# Altium PCB STAND_SSD_2246(CPU).PcbDoc (part 6 of 7)
Units mm, origin at the board's own origin, x right, y up, seen from the top; angles counter-clockwise.
Board outline 70 x 170 mm, 8 copper layers (L1:Top, L2:GND, L3:Sig, L4:VCC, L5:Sig, L6:Sig, L7:GND, L8:Bot), stack 1.112 mm thick; 174 components, 271 nets, 1671 pads, 771 vias.
Unrouted connection lines stored in the file: 138.
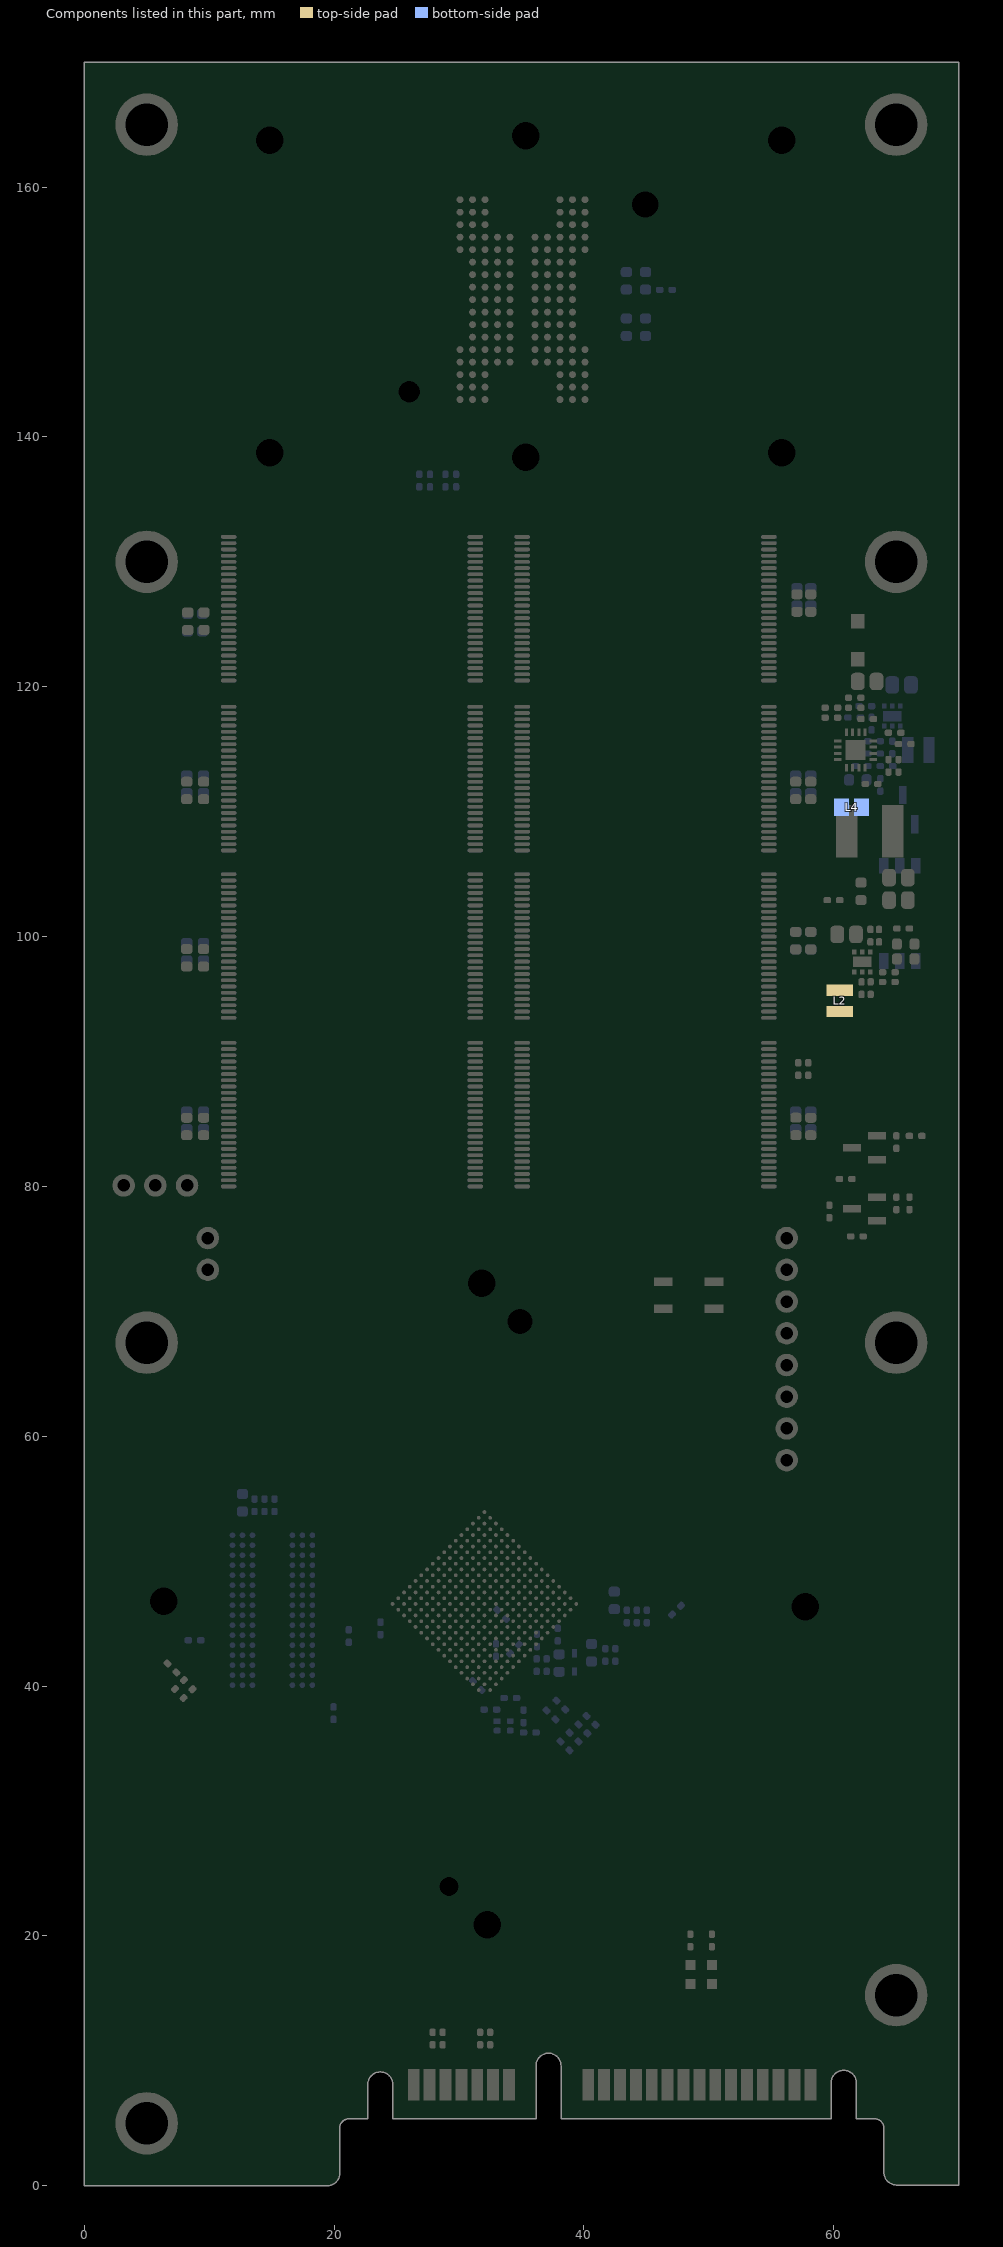
[diagram p12: the components of this part, seen from the top]

## Other copper (continued)
L5:Sig:
  pour cut-out: 50.503,87.796 ccw(c50.948,87.727) 51.392,87.796 ccw(c50.948,87.698)
  pour cut-out: 33.121,151.571 ccw(c33.565,151.502) 34.01,151.571 ccw(c33.565,151.473)
  pour cut-out: 32.121,146.571 ccw(c32.565,146.502) 33.01,146.571 ccw(c32.565,146.473)
  pour cut-out: 32.121,147.571 ccw(c32.565,147.502) 33.01,147.571 ccw(c32.565,147.473)
  pour cut-out: 55.624,123.696 ccw(c56.069,123.627) 56.513,123.696 ccw(c56.069,123.598)
  pour cut-out: 55.624,116.596 ccw(c56.069,116.527) 56.513,116.596 ccw(c56.069,116.498)
  pour cut-out: 55.624,110.096 ccw(c56.069,110.027) 56.513,110.096 ccw(c56.069,109.998)
  pour cut-out: 55.619,103.196 ccw(c56.064,103.127) 56.508,103.196 ccw(c56.064,103.098)
  pour cut-out: 55.624,96.696 ccw(c56.069,96.627) 56.513,96.696 ccw(c56.069,96.598)
  pour cut-out: 56.155,82.696 ccw(c56.6,82.627) 57.044,82.696 ccw(c56.6,82.598)
  pour cut-out: 56.124,88.396 ccw(c56.569,88.327) 57.013,88.396 ccw(c56.569,88.298)
  pour cut-out: 50.524,86.896 ccw(c50.969,86.827) 51.413,86.896 ccw(c50.969,86.798)
  pour cut-out: 52.524,85.096 ccw(c52.969,85.027) 53.413,85.096 ccw(c52.969,84.998)
  pour cut-out: 32.324,84.296 ccw(c32.769,84.227) 33.213,84.296 ccw(c32.769,84.198)
  pour cut-out: 32.304,89.396 ccw(c32.749,89.327) 33.193,89.396 ccw(c32.749,89.298)
  pour cut-out: 32.324,96.796 ccw(c32.769,96.727) 33.213,96.796 ccw(c32.769,96.698)
  pour cut-out: 32.304,102.896 ccw(c32.749,102.827) 33.193,102.896 ccw(c32.749,102.798)
  pour cut-out: 32.324,110.196 ccw(c32.769,110.127) 33.213,110.196 ccw(c32.769,110.098)
  pour cut-out: 32.304,116.296 ccw(c32.749,116.227) 33.193,116.296 ccw(c32.749,116.198)
  pour cut-out: 32.324,123.796 ccw(c32.769,123.727) 33.213,123.796 ccw(c32.769,123.698)
  pour cut-out: 32.824,128.696 ccw(c33.269,128.627) 33.713,128.696 ccw(c33.269,128.598)
  pour cut-out: 32.324,129.396 ccw(c32.769,129.327) 33.213,129.396 ccw(c32.769,129.298)
  pour cut-out: 3.156,78.659 cw(c3.156,80.075) 3.156,81.49 8.236,81.49 cw(c8.236,80.075) 8.236,78.659
  pour cut-out: 43.534,158.657 ccw(c44.916,158.609) 46.298,158.657 ccw(c44.916,158.609)
  pour cut-out: 24.824,143.654 ccw(c26.018,143.613) 27.213,143.654 ccw(c26.018,143.613)
  pour cut-out: 33.709,164.141 ccw(c35.327,164.085) 36.946,164.141 ccw(c35.327,164.085)
  pour cut-out: 13.209,163.791 ccw(c14.827,163.735) 16.446,163.791 ccw(c14.827,163.735)
  pour cut-out: 13.209,138.791 ccw(c14.827,138.735) 16.446,138.791 ccw(c14.827,138.735)
  pour cut-out: 33.709,138.441 ccw(c35.327,138.385) 36.946,138.441 ccw(c35.327,138.385)
  pour cut-out: 54.209,138.791 ccw(c55.827,138.735) 57.446,138.791 ccw(c55.827,138.735)
  pour cut-out: 54.209,163.791 ccw(c55.827,163.735) 57.446,163.791 ccw(c55.827,163.735)
  pour cut-out: 42.302,152.332 cw(c42.302,151.779) 42.302,151.226 40.662,151.226 40.5,151.387 40.5,152.333
  pour cut-out: 8.48,75.867 cw(c9.896,75.867) 11.311,75.867 11.311,73.303 cw(c9.896,73.303) 8.48,73.303
  pour cut-out: 54.815,75.867 cw(c56.231,75.867) 57.647,75.867 57.647,58.088 cw(c56.231,58.088) 54.815,58.088
  pour cut-out: 32.66,122.73 ccw(c33.256,122.637) 33.852,122.73 ccw(c33.256,122.597)
  pour cut-out: 32.66,115.13 ccw(c33.256,115.037) 33.852,115.13 ccw(c33.256,114.997)
  pour cut-out: 32.66,109.13 ccw(c33.256,109.037) 33.852,109.13 ccw(c33.256,108.997)
  pour cut-out: 32.66,101.73 ccw(c33.256,101.637) 33.852,101.73 ccw(c33.256,101.597)
  pour cut-out: 32.66,87.53 ccw(c33.256,87.437) 33.852,87.53 ccw(c33.256,87.397)
  pour cut-out: 32.66,95.73 ccw(c33.256,95.637) 33.852,95.73 ccw(c33.256,95.597)
  pour cut-out: 55.96,95.43 ccw(c56.556,95.337) 57.152,95.43 ccw(c56.556,95.297)
  pour cut-out: 55.96,122.883 ccw(c56.556,122.79) 57.152,122.883 ccw(c56.556,122.751)
  pour cut-out: 55.96,115.105 ccw(c56.556,115.012) 57.152,115.105 ccw(c56.556,114.972)
  pour cut-out: 55.96,109.155 ccw(c56.556,109.062) 57.152,109.155 ccw(c56.556,109.022)
  pour cut-out: 55.96,101.33 ccw(c56.556,101.237) 57.152,101.33 ccw(c56.556,101.197)
  pour cut-out: 28.017,23.993 ccw(c29.211,23.952) 30.406,23.993 ccw(c29.211,23.952)
  pour cut-out: 4.742,46.839 ccw(c6.361,46.783) 7.979,46.839 ccw(c6.361,46.783)
  pour cut-out: 30.622,20.959 ccw(c32.241,20.903) 33.859,20.959 ccw(c32.241,20.903)
  pour cut-out: 30.198,72.295 ccw(c31.816,72.239) 33.435,72.295 ccw(c31.816,72.239)
  pour cut-out: 33.604,69.251 ccw(c34.868,69.207) 36.132,69.251 ccw(c34.868,69.207)
  pour cut-out: 56.078,46.415 ccw(c57.697,46.359) 59.315,46.415 ccw(c57.697,46.359)
  pour cut-out: 19.22,47.88 19.523,47.873 19.523,48.373 ccw(c19.701,48.257) 19.656,48.465 19.22,48.465
  pour cut-out: 41.864,79.599 42.131,79.332 42.131,79.251 42.463,79.251 42.354,79.359 42.354,79.862
  pour cut-out: 41.418,81.146 41.893,80.671 41.726,80.671 41.411,80.357
  pour cut-out: 41.31,80.054 41.31,80.051 41.558,79.804 41.836,80.082 41.859,80.082 41.859,80.133 41.537,80.455
  pour cut-out: 53.459,128.769 53.114,128.424 53.114,128.758 53.012,128.861 53.145,128.994 53.245,128.994
  pour cut-out: 26.654,83.668 26.654,83.931 26.823,84.1 27.154,83.769 26.857,83.473
  pour cut-out: 26.558,97.276 26.558,97.285 26.882,97.609 27.175,97.316 27.177,97.316 27.177,97.312 26.846,96.981
  pour cut-out: 33.887,145.475 33.887,146.46 33.908,146.48 33.348,146.48 33.348,145.885 33.196,145.734
  pour cut-out: 66.975,81.05 67.531,81.606 67.576,81.606 67.576,81.624 67.091,82.109
  pour cut-out: 67.068,101.765 67.423,102.121 67.423,101.689
  pour cut-out: 65.246,96.01 65.615,96.379 65.615,96.605 65.15,96.605
  pour cut-out: 65.233,97.252 65.615,96.87 65.615,96.605 65.15,96.605 65.136,96.591
  pour cut-out: 66.996,83.61 67.329,83.943 67.42,83.943 67.42,83.662 67.379,83.621
  pour cut-out: 66.975,81.357 67.457,81.839 67.457,82.206 67.058,82.605
  pour cut-out: 65.759,96.931 65.759,96.269 65.758,96.268 65.136,96.268 65.136,96.913 65.155,96.932
  pour cut-out: 66.759,101.859 66.759,101.858 66.759,101.003 67.551,101.003 67.547,101.007 67.547,101.86
  pour cut-out: 66.759,83.659 66.759,83.658 66.759,82.803 67.551,82.803 67.547,82.807 67.547,83.66
  pour cut-out: 47.954,9.34 50.454,9.34 50.454,9.798 47.954,9.798
  pour cut-out: 48.554,10.957 49.854,10.957 49.854,10.498 48.554,10.498
  pour cut-out: 40.752,46.081 40.752,46.083 41.096,46.427 40.867,46.657 40.592,46.657 40.289,46.355
  pour cut-out: 11.402,44.812 12.272,44.812 12.272,44.481 12.272,44.48 11.402,44.48
  pour cut-out: 35.455,41.812 35.403,41.812 35.084,41.493 35.084,42.064 35.185,42.064 35.313,42.193
  pour cut-out: 12.912,39.821 12.645,39.821 12.645,39.388 12.912,39.388
  pour cut-out: 13.325,43.915 13.563,43.915 13.563,43.471 13.325,43.471
  pour cut-out: 29.459,43.836 29.27,43.647 29.576,43.341 29.765,43.53
  pour cut-out: 28.796,42.62 28.985,42.431 29.291,42.737 29.102,42.926
  pour cut-out: 28.985,42.457 28.795,42.268 29.101,41.962 29.29,42.151
  pour cut-out: 28.971,43.392 28.782,43.203 29.088,42.898 29.277,43.087
  pour cut-out: 29.57,45.184 29.759,45.373 29.453,45.679 29.264,45.49
  pour cut-out: 29.1,44.716 29.289,44.905 28.983,45.211 28.794,45.022
  pour cut-out: 30.045,48.391 30.234,48.58 29.928,48.886 29.739,48.697
  pour cut-out: 33.89,43.654 33.701,43.844 33.395,43.538 33.584,43.349
  pour cut-out: 34.176,44.256 34.366,44.445 34.06,44.751 33.871,44.562
  pour cut-out: 33.858,50.429 34.047,50.24 34.353,50.545 34.164,50.735
  pour cut-out: 33.59,51.643 33.4,51.454 33.706,51.148 33.895,51.338
  pour cut-out: 36.805,45.682 36.616,45.493 36.922,45.187 37.111,45.376
  pour cut-out: 36.797,49.359 36.608,49.17 36.914,48.864 37.103,49.054
  pour cut-out: 33.692,43.822 33.881,44.011 33.575,44.317 33.386,44.128
  pour cut-out: 33.238,41.511 33.427,41.7 33.121,42.006 32.932,41.817
  pour cut-out: 34.035,52.123 33.846,51.934 34.152,51.628 34.341,51.817
  pour cut-out: 35.861,50.297 35.672,50.108 35.978,49.802 36.167,49.991
  pour cut-out: 37.271,46.144 37.082,45.955 37.388,45.649 37.577,45.838
  pour cut-out: 13.87,51.53 13.87,51.263 14.302,51.263 14.302,51.53
  pour cut-out: 13.765,52.131 13.765,51.863 14.197,51.863 14.197,52.131
  pour cut-out: 25.132,128.572 24.938,128.378 25.295,128.021 25.489,128.215
  pour cut-out: 25.115,114.997 24.921,114.803 25.278,114.446 25.472,114.64
  pour cut-out: 27.319,113.417 27.513,113.611 27.156,113.968 26.962,113.774
  pour cut-out: 15.465,102.665 15.659,102.471 16.016,102.828 15.822,103.022
  pour cut-out: 15.95,102.186 16.143,101.992 16.5,102.349 16.306,102.542
  pour cut-out: 16.443,101.687 16.637,101.493 16.994,101.85 16.8,102.044
  pour cut-out: 16.141,96.51 15.948,96.316 16.304,95.959 16.498,96.153
  pour cut-out: 14.126,95.517 13.933,95.324 14.289,94.967 14.483,95.161
  pour cut-out: 15.992,89.337 15.798,89.531 15.441,89.174 15.635,88.98
  pour cut-out: 16.503,88.838 16.309,89.032 15.952,88.675 16.146,88.481
  pour cut-out: 16.987,88.345 16.793,88.539 16.436,88.182 16.63,87.988
  pour cut-out: 14.272,81.462 14.466,81.655 14.109,82.012 13.915,81.818
  pour cut-out: 16.305,82.475 16.499,82.669 16.142,83.025 15.949,82.832
  pour cut-out: 59.593,119.501 59.611,119.252 59.107,119.252 59.093,119.601
  pour cut-out: 52.459,115.069 52.653,114.673 52.959,115.131 52.765,115.527
  pour cut-out: 53.459,101.069 53.29,100.8 52.832,101.106 53.128,101.4
  pour cut-out: 52.951,123.864 52.762,124.053 52.456,123.747 52.645,123.558
  pour cut-out: 48.459,113.953 48.27,114.142 47.965,113.836 48.154,113.647
  pour cut-out: 52.956,110.263 52.767,110.452 52.461,110.146 52.65,109.957
  pour cut-out: 48.457,102.051 48.268,102.24 47.962,101.934 48.151,101.745
L6:Sig:
  pour cut-out: 31.115,48.515 ccw(c31.559,48.446) 32.004,48.515 ccw(c31.559,48.417)
  pour cut-out: 32.293,89.378 ccw(c32.738,89.309) 33.182,89.378 ccw(c32.738,89.28)
  pour cut-out: 32.313,96.778 ccw(c32.758,96.709) 33.202,96.778 ccw(c32.758,96.68)
  pour cut-out: 32.293,102.878 ccw(c32.738,102.809) 33.182,102.878 ccw(c32.738,102.78)
  pour cut-out: 32.313,110.178 ccw(c32.758,110.109) 33.202,110.178 ccw(c32.758,110.08)
  pour cut-out: 32.293,116.278 ccw(c32.738,116.209) 33.182,116.278 ccw(c32.738,116.18)
  pour cut-out: 32.313,123.778 ccw(c32.758,123.709) 33.202,123.778 ccw(c32.758,123.68)
  pour cut-out: 32.313,129.378 ccw(c32.758,129.309) 33.202,129.378 ccw(c32.758,129.28)
  pour cut-out: 29.613,82.478 ccw(c30.058,82.409) 30.502,82.478 ccw(c30.058,82.38)
  pour cut-out: 55.613,83.178 ccw(c56.058,83.109) 56.502,83.178 ccw(c56.058,83.08)
  pour cut-out: 55.608,87.778 ccw(c56.052,87.709) 56.497,87.778 ccw(c56.052,87.68)
  pour cut-out: 55.613,96.678 ccw(c56.058,96.609) 56.502,96.678 ccw(c56.058,96.58)
  pour cut-out: 55.608,103.178 ccw(c56.052,103.109) 56.497,103.178 ccw(c56.052,103.08)
  pour cut-out: 55.613,110.078 ccw(c56.058,110.009) 56.502,110.078 ccw(c56.058,109.98)
  pour cut-out: 55.613,116.578 ccw(c56.058,116.509) 56.502,116.578 ccw(c56.058,116.48)
  pour cut-out: 55.613,123.678 ccw(c56.058,123.609) 56.502,123.678 ccw(c56.058,123.58)
  pour cut-out: 55.613,130.178 ccw(c56.058,130.109) 56.502,130.178 ccw(c56.058,130.08)
  pour cut-out: 3.156,78.659 cw(c3.156,80.075) 3.156,81.49 8.236,81.49 cw(c8.236,80.075) 8.236,78.659
  pour cut-out: 43.534,158.657 ccw(c44.916,158.609) 46.298,158.657 ccw(c44.916,158.609)
  pour cut-out: 24.824,143.654 ccw(c26.018,143.613) 27.213,143.654 ccw(c26.018,143.613)
  pour cut-out: 33.709,164.141 ccw(c35.327,164.085) 36.946,164.141 ccw(c35.327,164.085)
  pour cut-out: 13.209,163.791 ccw(c14.827,163.735) 16.446,163.791 ccw(c14.827,163.735)
  pour cut-out: 13.209,138.791 ccw(c14.827,138.735) 16.446,138.791 ccw(c14.827,138.735)
  pour cut-out: 33.709,138.441 ccw(c35.327,138.385) 36.946,138.441 ccw(c35.327,138.385)
  pour cut-out: 54.209,138.791 ccw(c55.827,138.735) 57.446,138.791 ccw(c55.827,138.735)
  pour cut-out: 54.209,163.791 ccw(c55.827,163.735) 57.446,163.791 ccw(c55.827,163.735)
  pour cut-out: 8.48,75.867 cw(c9.896,75.867) 11.311,75.867 11.311,73.303 cw(c9.896,73.303) 8.48,73.303
  pour cut-out: 54.815,75.867 cw(c56.231,75.867) 57.647,75.867 57.647,58.088 cw(c56.231,58.088) 54.815,58.088
  pour cut-out: 28.017,23.993 ccw(c29.211,23.952) 30.406,23.993 ccw(c29.211,23.952)
  pour cut-out: 4.742,46.839 ccw(c6.361,46.783) 7.979,46.839 ccw(c6.361,46.783)
  pour cut-out: 30.622,20.959 ccw(c32.241,20.903) 33.859,20.959 ccw(c32.241,20.903)
  pour cut-out: 30.198,72.295 ccw(c31.816,72.239) 33.435,72.295 ccw(c31.816,72.239)
  pour cut-out: 33.604,69.251 ccw(c34.868,69.207) 36.132,69.251 ccw(c34.868,69.207)
  pour cut-out: 56.078,46.415 ccw(c57.697,46.359) 59.315,46.415 ccw(c57.697,46.359)
  pour cut-out: 26.527,83.806 26.533,83.806 26.826,84.099 27.121,83.803 27.163,83.803 27.163,83.772 26.847,83.456
  pour cut-out: 53.586,129.406 53.593,129.399 54.156,129.399 54.156,129.111 54.108,129.062 54.07,129.1 53.79,129.1
  pour cut-out: 33.903,56.615 33.904,56.615 34.184,56.895 34.49,56.588 34.49,56.436 34.485,56.436 34.158,56.11
  pour cut-out: 30.872,132.889 30.864,132.897 30.272,132.897 30.272,133.216 30.603,133.547 31.236,133.547
  pour cut-out: 17.765,128.769 16.642,128.769 16.595,128.722 16.425,128.893 16.425,129.341 17.138,129.341 17.571,129.773
  pour cut-out: 35.021,145.333 35.023,145.332 35.928,145.332 35.928,144.916 35.959,144.884 35.885,144.81 35.885,144.532
  pour cut-out: 33.885,145.463 34.462,145.463 34.468,145.469 34.581,145.356 34.581,145.153 34.59,145.153 34.697,145.047 34.539,144.89 34.539,144.746 34.119,144.746 34.075,144.702
  pour cut-out: 31.223,145.458 31.216,145.452 30.91,145.452 30.91,145.104 31.292,144.722 31.292,144.644 31.816,144.644 31.903,144.557 32.052,144.706 32.052,144.815
  pour cut-out: 30.641,144.969 30.639,144.967 30.404,144.967 30.404,144.593 30.53,144.467 30.821,144.467 30.85,144.495
  pour cut-out: 38.621,154.843 37.806,154.843 37.634,154.671 37.634,154.125 38.351,154.125 38.383,154.156
  pour cut-out: 30.333,155.571 30.333,155.184 30.394,155.122 30.496,155.224 30.748,155.224 30.748,155.282 31.086,155.62 30.92,155.787 30.92,155.983
  pour cut-out: 26.539,97.274 26.892,97.627 26.938,97.627 26.938,97.565 27.179,97.324 26.846,96.992 26.846,96.946
  pour cut-out: 38.882,44.427 39.233,44.076 39.391,44.076 39.391,44.344
  pour cut-out: 39.877,44.105 40.234,44.462 40.234,44.539 40.05,44.539 39.996,44.594
  pour cut-out: 39.081,43.815 39.999,43.815 39.996,43.818 39.996,44.594 39.089,44.594 39.078,44.583
  pour cut-out: 42.451,45.627 42.451,46.105 42.273,46.283 42.14,46.149 42.14,45.994
  pour cut-out: 38.865,37.114 39.238,37.487 39.141,37.584 38.982,37.584
  pour cut-out: 38.307,36.07 38.309,36.07 38.664,35.715 38.758,35.808 38.758,36.029
  pour cut-out: 38.29,36.518 38.29,36.52 38.626,36.857 38.626,36.458
  pour cut-out: 39.412,38.061 39.412,37.398 39.411,37.398 38.764,37.398 38.764,38.044 38.781,38.06
  pour cut-out: 38.093,36.638 38.093,35.975 38.704,35.975 38.811,36.082 38.732,36.162 38.732,36.64
  pour cut-out: 47.954,9.34 50.454,9.34 50.454,9.798 47.83,9.798 47.769,9.86
  pour cut-out: 48.554,10.957 49.854,10.957 49.854,10.498 48.554,10.498
  pour cut-out: 42.115,44.855 42.764,45.504 42.763,45.504 42.31,45.957 41.768,45.415 41.594,45.415
  pour cut-out: 13.397,43.832 13.563,43.832 13.563,43.579 13.397,43.579
  pour cut-out: 28.987,42.446 28.808,42.267 29.088,41.986 29.267,42.166
  pour cut-out: 29.273,42.712 29.093,42.891 28.813,42.611 28.992,42.431
  pour cut-out: 32.959,40.324 33.138,40.145 33.419,40.425 33.239,40.604
  pour cut-out: 33.894,43.651 33.715,43.83 33.434,43.55 33.613,43.371
  pour cut-out: 13.55,42.034 13.356,41.84 13.713,41.483 13.906,41.677
  pour cut-out: 33.245,41.523 33.424,41.702 33.144,41.982 32.964,41.803
  pour cut-out: 33.144,48.399 32.964,48.22 33.245,47.94 33.424,48.119
  pour cut-out: 59.613,119.277 59.613,119.551 59.109,119.551 59.109,119.277
  pour cut-out: 66.042,96.431 66.316,96.431 66.316,96.936 66.042,96.936
  pour cut-out: 56.03,82.756 56.224,82.562 56.581,82.919 56.387,83.113
  pour cut-out: 25.115,128.59 24.921,128.396 25.278,128.039 25.472,128.233
  pour cut-out: 27.109,113.975 26.916,113.781 27.272,113.424 27.466,113.618
  pour cut-out: 25.132,114.964 24.939,114.77 25.295,114.413 25.489,114.607
  pour cut-out: 16.312,95.962 16.506,96.156 16.149,96.513 15.955,96.319
  pour cut-out: 14.292,94.97 14.486,95.164 14.129,95.521 13.935,95.327
L4:VCC:
  pour cut-out: 33.896,42.071 ccw(c34.34,42.002) 34.785,42.071 ccw(c34.34,41.973)
  pour cut-out: 35.19,74.862 ccw(c35.635,74.793) 36.079,74.862 ccw(c35.635,74.764)
  pour cut-out: 31.138,45.748 ccw(c31.583,45.679) 32.027,45.748 ccw(c31.583,45.65)
  pour cut-out: 28.84,48.046 ccw(c29.284,47.977) 29.729,48.046 ccw(c29.284,47.948)
  pour cut-out: 27.921,48.966 ccw(c28.365,48.896) 28.81,48.966 ccw(c28.365,48.867)
  pour cut-out: 27.002,43.45 ccw(c27.446,43.381) 27.89,43.45 ccw(c27.446,43.352)
  pour cut-out: 28.84,43.45 ccw(c29.284,43.381) 29.729,43.45 ccw(c29.284,43.352)
  pour cut-out: 19.982,37.694 ccw(c20.578,37.601) 21.174,37.694 ccw(c20.578,37.562)
  pour cut-out: 61.497,89.51 ccw(c62.093,89.417) 62.689,89.51 ccw(c62.093,89.378)
  pour cut-out: 9.296,134.811 ccw(c9.892,134.718) 10.488,134.811 ccw(c9.892,134.679)
  pour cut-out: 58.006,70.864 ccw(c58.601,70.771) 59.197,70.864 ccw(c58.601,70.732)
  pour cut-out: 1.929,80.276 ccw(c3.151,80.086) 4.372,80.276 ccw(c3.151,80.006)
  pour cut-out: 7.009,80.276 ccw(c8.231,80.086) 9.452,80.276 ccw(c8.231,80.006)
  pour cut-out: 43.534,158.657 ccw(c44.916,158.609) 46.298,158.657 ccw(c44.916,158.609)
  pour cut-out: 24.824,143.654 ccw(c26.018,143.613) 27.213,143.654 ccw(c26.018,143.613)
  pour cut-out: 33.459,164.141 ccw(c35.343,164.075) 37.227,164.141 ccw(c35.343,164.075)
  pour cut-out: 12.959,163.791 ccw(c14.843,163.725) 16.727,163.791 ccw(c14.843,163.725)
  pour cut-out: 12.959,138.791 ccw(c14.843,138.725) 16.727,138.791 ccw(c14.843,138.725)
  pour cut-out: 33.459,138.441 ccw(c35.343,138.375) 37.227,138.441 ccw(c35.343,138.375)
  pour cut-out: 53.959,138.791 ccw(c55.843,138.725) 57.727,138.791 ccw(c55.843,138.725)
  pour cut-out: 53.959,163.791 ccw(c55.843,163.725) 57.727,163.791 ccw(c55.843,163.725)
  pour cut-out: 8.672,73.527 ccw(c9.893,73.336) 11.115,73.527 ccw(c9.893,73.256)
  pour cut-out: 54.815,75.867 cw(c56.231,75.867) 57.647,75.867 57.647,58.088 cw(c56.231,58.088) 54.815,58.088
  pour cut-out: 61.789,165.111 ccw(c65,165) 68.211,165.111 ccw(c65,165)
  pour cut-out: 1.789,165.111 ccw(c5,165) 8.211,165.111 ccw(c5,165)
  pour cut-out: 42.713,42.117 ccw(c43.309,42.024) 43.905,42.117 ccw(c43.309,41.985)
  pour cut-out: 34.299,41.599 ccw(c34.895,41.506) 35.491,41.599 ccw(c34.895,41.467)
  pour cut-out: 36.667,39.427 ccw(c37.263,39.334) 37.859,39.427 ccw(c37.263,39.295)
  pour cut-out: 29.794,20.33 ccw(c30.39,20.238) 30.985,20.33 ccw(c30.39,20.198)
  pour cut-out: 62.063,101.709 ccw(c62.659,101.616) 63.255,101.709 ccw(c62.659,101.577)
  pour cut-out: 61.688,98.084 ccw(c62.284,97.991) 62.88,98.084 ccw(c62.284,97.952)
  pour cut-out: 61.789,130.111 ccw(c65,130) 68.211,130.111 ccw(c65,130)
  pour cut-out: 61.789,67.611 ccw(c65,67.5) 68.211,67.611 ccw(c65,67.5)
  pour cut-out: 61.791,15.374 ccw(c65.002,15.263) 68.214,15.374 ccw(c65.002,15.263)
  pour cut-out: 1.789,130.111 ccw(c5,130) 8.211,130.111 ccw(c5,130)
  pour cut-out: 1.789,5.111 ccw(c5,5) 8.211,5.111 ccw(c5,5)
  pour cut-out: 1.789,67.611 ccw(c5,67.5) 8.211,67.611 ccw(c5,67.5)
  pour cut-out: 58.763,119.109 ccw(c59.359,119.016) 59.955,119.109 ccw(c59.359,118.977)
  pour cut-out: 58.325,108.571 ccw(c58.921,108.479) 59.517,108.571 ccw(c58.921,108.439)
  pour cut-out: 58.325,109.415 ccw(c58.921,109.322) 59.517,109.415 ccw(c58.921,109.283)
  pour cut-out: 58.063,79.909 ccw(c58.659,79.816) 59.255,79.909 ccw(c58.659,79.777)
  pour cut-out: 28.017,23.993 ccw(c29.211,23.952) 30.406,23.993 ccw(c29.211,23.952)
  pour cut-out: 4.742,46.839 ccw(c6.361,46.783) 7.979,46.839 ccw(c6.361,46.783)
  pour cut-out: 30.622,20.959 ccw(c32.241,20.903) 33.859,20.959 ccw(c32.241,20.903)
  pour cut-out: 30.198,72.295 ccw(c31.816,72.239) 33.435,72.295 ccw(c31.816,72.239)
  pour cut-out: 33.604,69.251 ccw(c34.868,69.207) 36.132,69.251 ccw(c34.868,69.207)
  pour cut-out: 55.828,46.415 ccw(c57.712,46.35) 59.596,46.415 ccw(c57.712,46.35)
  pour cut-out: 29.976,44.056 30.427,44.056 30.427,43.695 30.486,43.636 30.242,43.392 30.049,43.392
  pour cut-out: 36.549,38.966 36.88,38.634 37.09,38.844 37.09,38.895 36.993,38.895 36.73,39.158
  pour cut-out: 25.153,115.067 24.725,114.639 25.173,114.186 25.693,114.706
  pour cut-out: 52.725,114.566 52.725,114.666 52.225,115.166 52.693,115.634 52.693,115.534 53.193,115.034
  pour cut-out: 26.564,97.291 26.952,97.679 27.031,97.679 27.031,97.55 27.224,97.357 26.869,97.002 26.869,96.938
  pour cut-out: 26.888,113.683 27.225,114.02 27.234,114.02 27.234,114 27.485,113.75 27.198,113.463 27.198,113.34
  pour cut-out: 41.991,79.624 42.157,79.458 42.157,79.378 42.29,79.378 42.465,79.552 42.237,79.781 42.237,79.914
  pour cut-out: 41.31,80.054 41.409,80.054 41.533,79.93 41.826,80.224 41.826,80.244 41.633,80.244 41.434,80.443
  pour cut-out: 41.515,80.912 41.652,80.775 41.691,80.775 41.691,80.582 41.553,80.443 41.314,80.443
  pour cut-out: 13.237,43.91 13.755,43.91 13.791,43.875 13.74,43.825 13.74,43.427 13.109,43.427 13.086,43.45
  pour cut-out: 34.506,56.561 34.218,56.849 33.844,56.475 34.132,56.187
  pour cut-out: 53.532,101.145 53.244,101.433 52.87,101.06 53.158,100.772
  pour cut-out: 53.604,128.769 53.316,129.057 52.942,128.683 53.23,128.395
  pour cut-out: 25.539,128.332 25.251,128.62 24.877,128.246 25.165,127.958
  pour cut-out: 27.239,83.862 26.951,84.15 26.577,83.776 26.865,83.488
  pour cut-out: 52.902,115.165 52.772,115.295 52.552,115.075 52.682,114.945
  pour cut-out: 33.589,74.668 33.589,75.425 33.78,75.617 35.682,75.617 36.227,75.071 36.227,74.659
  pour cut-out: 8.668,73.127 11.119,73.127 11.119,74.561 11.17,74.612 11.095,74.686 8.675,74.686
  pour cut-out: 40.294,46.387 40.717,46.81 40.978,46.549 40.978,46.369 40.624,46.016
  pour cut-out: 18.061,45.779 18.061,45.556 17.685,45.556 17.685,45.779
  pour cut-out: 25.872,47.1 26.002,47.23 25.782,47.451 25.652,47.321
  pour cut-out: 27.723,43.424 27.853,43.554 27.632,43.774 27.503,43.644
  pour cut-out: 27.387,47.302 27.257,47.432 27.037,47.212 27.167,47.082
  pour cut-out: 29.556,43.429 29.686,43.559 29.466,43.779 29.336,43.649
  pour cut-out: 29.207,42.713 29.077,42.843 28.857,42.623 28.987,42.493
  pour cut-out: 29.1,42.026 29.23,42.156 29.009,42.376 28.879,42.246
  pour cut-out: 29.12,44.772 29.25,44.902 29.03,45.122 28.9,44.993
  pour cut-out: 28.545,47.438 28.415,47.308 28.635,47.087 28.765,47.217
  pour cut-out: 29.927,48.816 29.797,48.686 30.017,48.466 30.147,48.595
  pour cut-out: 31.986,48.223 31.856,48.353 31.636,48.133 31.766,48.003
  pour cut-out: 33.362,40.415 33.232,40.545 33.012,40.324 33.142,40.195
  pour cut-out: 33.477,43.536 33.607,43.406 33.827,43.627 33.697,43.756
  pour cut-out: 34.06,44.69 33.93,44.56 34.151,44.34 34.281,44.47
  pour cut-out: 33.828,49.144 33.698,49.274 33.478,49.053 33.608,48.923
  pour cut-out: 33.706,48.459 33.836,48.589 33.616,48.809 33.486,48.679
  pour cut-out: 33.221,48.002 33.351,48.132 33.13,48.352 33.001,48.222
  pour cut-out: 33.37,49.615 33.24,49.745 33.02,49.525 33.149,49.395
  pour cut-out: 33.952,50.448 34.082,50.318 34.302,50.539 34.172,50.669
  pour cut-out: 34.062,52.038 33.932,51.908 34.152,51.687 34.282,51.817
  pour cut-out: 33.6,51.571 33.47,51.441 33.691,51.221 33.82,51.351
  pour cut-out: 34.967,47.44 34.837,47.31 35.057,47.09 35.187,47.22
  pour cut-out: 34.967,49.285 34.837,49.155 35.057,48.935 35.187,49.065
  pour cut-out: 36.817,45.594 36.687,45.464 36.907,45.244 37.037,45.374
  pour cut-out: 36.914,48.912 37.044,49.042 36.824,49.262 36.694,49.132
  pour cut-out: 25.645,45.837 25.775,45.707 25.995,45.927 25.866,46.057
  pour cut-out: 28.204,43.89 28.334,44.02 28.114,44.24 27.984,44.11
  pour cut-out: 28.191,45.712 28.321,45.841 28.101,46.062 27.971,45.932
  pour cut-out: 31.313,50.192 31.183,50.062 31.403,49.841 31.533,49.971
  pour cut-out: 33.611,44.209 33.481,44.079 33.701,43.859 33.831,43.988
  pour cut-out: 33.161,41.91 33.032,41.78 33.252,41.56 33.382,41.69
  pour cut-out: 33.008,43.998 33.138,43.869 33.358,44.089 33.228,44.219
  pour cut-out: 36,49.837 36.13,49.967 35.91,50.188 35.78,50.058
  pour cut-out: 37.256,46.073 37.127,45.943 37.347,45.723 37.477,45.853
  pour cut-out: 24.281,46.304 24.411,46.174 24.631,46.395 24.501,46.525
  pour cut-out: 34.402,47.227 34.532,47.098 34.752,47.318 34.622,47.448
  pour cut-out: 52.889,123.854 52.76,123.984 52.539,123.764 52.669,123.634
  pour cut-out: 48.371,113.941 48.241,114.071 48.021,113.85 48.151,113.721
  pour cut-out: 48.399,102.035 48.269,102.164 48.049,101.944 48.179,101.814
  pour cut-out: 52.897,110.246 52.767,110.375 52.547,110.155 52.677,110.025
L2:GND:
  pour cut-out: 3.156,78.659 cw(c3.156,80.075) 3.156,81.49 8.236,81.49 cw(c8.236,80.075) 8.236,78.659
  pour cut-out: 43.534,158.657 ccw(c44.916,158.609) 46.298,158.657 ccw(c44.916,158.609)
  pour cut-out: 24.824,143.654 ccw(c26.018,143.613) 27.213,143.654 ccw(c26.018,143.613)
  pour cut-out: 33.709,164.141 ccw(c35.327,164.085) 36.946,164.141 ccw(c35.327,164.085)
  pour cut-out: 13.209,163.791 ccw(c14.827,163.735) 16.446,163.791 ccw(c14.827,163.735)
  pour cut-out: 13.209,138.791 ccw(c14.827,138.735) 16.446,138.791 ccw(c14.827,138.735)
  pour cut-out: 33.709,138.441 ccw(c35.327,138.385) 36.946,138.441 ccw(c35.327,138.385)
  pour cut-out: 54.209,138.791 ccw(c55.827,138.735) 57.446,138.791 ccw(c55.827,138.735)
  pour cut-out: 54.209,163.791 ccw(c55.827,163.735) 57.446,163.791 ccw(c55.827,163.735)
  pour cut-out: 8.48,75.867 cw(c9.896,75.867) 11.311,75.867 11.311,73.303 cw(c9.896,73.303) 8.48,73.303
  pour cut-out: 54.815,75.867 cw(c56.231,75.867) 57.647,75.867 57.647,58.088 cw(c56.231,58.088) 54.815,58.088
  pour cut-out: 28.017,23.993 ccw(c29.211,23.952) 30.406,23.993 ccw(c29.211,23.952)
  pour cut-out: 4.742,46.839 ccw(c6.361,46.783) 7.979,46.839 ccw(c6.361,46.783)
  pour cut-out: 30.622,20.959 ccw(c32.241,20.903) 33.859,20.959 ccw(c32.241,20.903)
  pour cut-out: 30.198,72.295 ccw(c31.816,72.239) 33.435,72.295 ccw(c31.816,72.239)
  pour cut-out: 33.604,69.251 ccw(c34.868,69.207) 36.132,69.251 ccw(c34.868,69.207)
  pour cut-out: 56.078,46.415 ccw(c57.697,46.359) 59.315,46.415 ccw(c57.697,46.359)
  pour cut-out: 33.903,56.615 34.183,56.895 34.184,56.895 34.184,56.743 34.49,56.436 34.21,56.157 34.209,56.157
  pour cut-out: 26.654,97.331 26.823,97.5 26.975,97.652 27.228,97.342 26.806,96.92 26.735,96.92
  pour cut-out: 41.991,79.624 41.991,79.543 42.157,79.378 42.314,79.535 42.429,79.535 42.429,79.677 42.259,79.846
  pour cut-out: 42.232,80.414 42.387,80.258 42.407,80.258 42.407,80.209 42.254,80.055 42.07,80.239 41.894,80.239
  pour cut-out: 41.49,81.039 41.607,81.039 41.799,80.847 41.654,80.702 41.654,80.479 41.324,80.479 41.315,80.47
  pour cut-out: 41.31,80.054 41.558,79.807 41.558,79.903 41.894,80.239 41.654,80.479 41.577,80.479
  pour cut-out: 26.569,83.774 26.9,83.443 27.275,83.817 26.942,84.15
  pour cut-out: 48.554,10.957 49.854,10.957 49.854,10.498 48.554,10.498
  pour cut-out: 47.954,9.34 50.454,9.34 50.454,9.798 47.954,9.798
  pour cut-out: 19.255,46.289 19.266,46.277 19.486,46.277 19.486,45.809 19.475,45.82 19.255,45.82
  pour cut-out: 40.42,46.412 40.589,46.581 40.589,46.643 40.92,46.312 40.664,46.056 40.628,46.056
  pour cut-out: 13.325,43.94 13.325,43.554 13.635,43.554 13.635,43.94
  pour cut-out: 59.105,119.54 59.105,119.266 59.61,119.266 59.61,119.54
  pour cut-out: 25.285,128.014 25.479,128.208 25.122,128.565 24.928,128.371
  pour cut-out: 25.124,114.998 24.93,114.805 25.287,114.448 25.481,114.642
  pour cut-out: 27.156,113.979 26.962,113.785 27.319,113.428 27.513,113.622
  pour cut-out: 52.987,115.207 52.794,115.401 52.437,115.044 52.631,114.85
  pour cut-out: 15.975,102.827 15.781,103.021 15.424,102.664 15.618,102.47
  pour cut-out: 16.472,102.346 16.278,102.54 15.921,102.183 16.115,101.989
  pour cut-out: 16.989,101.834 16.795,102.028 16.438,101.671 16.632,101.477
  pour cut-out: 14.284,94.986 14.478,95.18 14.121,95.537 13.927,95.343
  pour cut-out: 16.29,95.968 16.484,96.162 16.127,96.519 15.933,96.325
  pour cut-out: 53.289,100.816 53.483,101.01 53.126,101.367 52.932,101.173
  pour cut-out: 66.026,96.418 66.301,96.418 66.301,96.923 66.026,96.923
  pour cut-out: 15.999,89.316 15.806,89.51 15.449,89.153 15.643,88.959
  pour cut-out: 16.491,88.83 16.297,89.024 15.94,88.667 16.134,88.473
  pour cut-out: 16.95,88.311 16.756,88.504 16.399,88.148 16.593,87.954
  pour cut-out: 14.296,81.469 14.49,81.663 14.133,82.02 13.939,81.826
  pour cut-out: 16.289,82.477 16.482,82.671 16.126,83.028 15.932,82.834
  pour cut-out: 13.722,52.127 13.722,51.853 14.227,51.853 14.227,52.127
  pour cut-out: 13.846,51.534 13.846,51.26 14.35,51.26 14.35,51.534
  pour cut-out: 12.91,39.865 12.636,39.865 12.636,39.36 12.91,39.36
  pour cut-out: 56.611,82.951 56.368,83.099 56.011,82.742 56.254,82.594
  pour cut-out: 56.411,87.7 56.559,87.943 56.202,88.3 56.054,88.057
  pour cut-out: 52.717,128.826 52.717,128.573 53.114,128.573 53.114,128.826
  pour cut-out: 52.956,123.859 52.777,124.038 52.497,123.758 52.676,123.579
  pour cut-out: 48.447,113.94 48.268,114.12 47.988,113.839 48.167,113.66
  pour cut-out: 52.932,110.261 52.752,110.44 52.472,110.16 52.651,109.981
  pour cut-out: 47.979,101.961 48.158,101.782 48.439,102.062 48.259,102.242
  pour cut-out: 34.158,51.617 34.337,51.796 34.057,52.077 33.878,51.898
  pour cut-out: 33.704,51.181 33.883,51.36 33.603,51.641 33.423,51.462
  pour cut-out: 31.397,49.805 31.577,49.985 31.296,50.265 31.117,50.086
  pour cut-out: 33.875,50.42 34.055,50.241 34.335,50.521 34.156,50.7
  pour cut-out: 32.972,49.512 33.151,49.333 33.431,49.613 33.252,49.792
  pour cut-out: 33.403,49.053 33.582,48.874 33.863,49.154 33.684,49.334
  pour cut-out: 36.814,49.345 36.635,49.166 36.916,48.885 37.095,49.064
  pour cut-out: 35.897,50.258 35.718,50.078 35.998,49.798 36.178,49.977
  pour cut-out: 34.985,49.331 34.805,49.152 35.086,48.872 35.265,49.051
  pour cut-out: 33.605,48.859 33.426,48.68 33.706,48.399 33.886,48.578
  pour cut-out: 33.134,48.422 32.954,48.243 33.235,47.963 33.414,48.142
  pour cut-out: 34.801,47.327 34.621,47.506 34.341,47.226 34.52,47.046
  pour cut-out: 35.107,47.026 35.286,47.206 35.006,47.486 34.826,47.307
  pour cut-out: 37.385,45.656 37.564,45.835 37.284,46.116 37.105,45.937
  pour cut-out: 36.906,45.199 37.086,45.379 36.805,45.659 36.626,45.48
  pour cut-out: 33.429,43.535 33.608,43.356 33.888,43.636 33.709,43.815
  pour cut-out: 34.065,44.746 33.885,44.566 34.166,44.286 34.345,44.465
  pour cut-out: 33.616,44.268 33.437,44.088 33.717,43.808 33.897,43.987
  pour cut-out: 33.142,41.985 32.963,41.806 33.243,41.526 33.422,41.705
  pour cut-out: 33.403,40.41 33.224,40.589 32.943,40.308 33.122,40.129
  pour cut-out: 29.278,42.708 29.099,42.887 28.819,42.607 28.998,42.427
  pour cut-out: 29.11,41.96 29.29,42.139 29.009,42.42 28.83,42.24
  pour cut-out: 29.566,43.358 29.745,43.537 29.465,43.817 29.285,43.638
  pour cut-out: 29.11,42.879 29.29,43.058 29.009,43.338 28.83,43.159
  pour cut-out: 30.048,48.397 30.227,48.576 29.947,48.856 29.767,48.677
  pour cut-out: 26.797,47.038 26.976,47.218 26.696,47.498 26.517,47.319
  pour cut-out: 26.351,46.566 26.53,46.746 26.25,47.026 26.07,46.847
  pour cut-out: 28.169,45.654 28.348,45.833 28.068,46.114 27.888,45.935
  pour cut-out: 28.654,46.101 28.833,46.28 28.553,46.56 28.373,46.381
  pour cut-out: 29.572,45.176 29.752,45.355 29.471,45.635 29.292,45.456
  pour cut-out: 29.113,44.723 29.292,44.902 29.012,45.182 28.833,45.003
  pour cut-out: 28.188,43.823 28.367,44.002 28.087,44.283 27.908,44.104
  pour cut-out: 27.722,43.345 27.902,43.524 27.621,43.804 27.442,43.625
  pour cut-out: 24.218,46.288 24.398,46.109 24.678,46.389 24.499,46.569
  pour cut-out: 26.984,47.214 27.163,47.035 27.443,47.315 27.264,47.494
  pour cut-out: 25.605,46.759 25.784,46.579 26.065,46.86 25.885,47.039
L7:GND:
  pour cut-out: 3.156,78.659 cw(c3.156,80.075) 3.156,81.49 8.236,81.49 cw(c8.236,80.075) 8.236,78.659
  pour cut-out: 43.534,158.657 ccw(c44.916,158.609) 46.298,158.657 ccw(c44.916,158.609)
  pour cut-out: 24.824,143.654 ccw(c26.018,143.613) 27.213,143.654 ccw(c26.018,143.613)
  pour cut-out: 33.709,164.141 ccw(c35.327,164.085) 36.946,164.141 ccw(c35.327,164.085)
  pour cut-out: 13.209,163.791 ccw(c14.827,163.735) 16.446,163.791 ccw(c14.827,163.735)
  pour cut-out: 13.209,138.791 ccw(c14.827,138.735) 16.446,138.791 ccw(c14.827,138.735)
  pour cut-out: 33.709,138.441 ccw(c35.327,138.385) 36.946,138.441 ccw(c35.327,138.385)
  pour cut-out: 54.209,138.791 ccw(c55.827,138.735) 57.446,138.791 ccw(c55.827,138.735)
  pour cut-out: 54.209,163.791 ccw(c55.827,163.735) 57.446,163.791 ccw(c55.827,163.735)
  pour cut-out: 8.48,75.867 cw(c9.896,75.867) 11.311,75.867 11.311,73.303 cw(c9.896,73.303) 8.48,73.303
  pour cut-out: 54.815,75.867 cw(c56.231,75.867) 57.647,75.867 57.647,58.088 cw(c56.231,58.088) 54.815,58.088
  pour cut-out: 28.017,23.993 ccw(c29.211,23.952) 30.406,23.993 ccw(c29.211,23.952)
  pour cut-out: 4.742,46.839 ccw(c6.361,46.783) 7.979,46.839 ccw(c6.361,46.783)
  pour cut-out: 30.622,20.959 ccw(c32.241,20.903) 33.859,20.959 ccw(c32.241,20.903)
  pour cut-out: 30.198,72.295 ccw(c31.816,72.239) 33.435,72.295 ccw(c31.816,72.239)
  pour cut-out: 33.604,69.251 ccw(c34.868,69.207) 36.132,69.251 ccw(c34.868,69.207)
  pour cut-out: 56.078,46.415 ccw(c57.697,46.359) 59.315,46.415 ccw(c57.697,46.359)
  pour cut-out: 27.29,113.4 cw(c27.532,113.4) 27.361,113.571 27.459,113.669 27.128,114 26.959,113.731
  pour cut-out: 34.184,56.895 33.829,56.54 33.829,56.472 33.882,56.472 34.196,56.158 34.585,56.547 34.623,56.547
  pour cut-out: 26.823,84.1 26.823,84.094 26.418,83.689 26.671,83.435 26.938,83.435 26.938,83.498 27.282,83.842
  pour cut-out: 41.991,79.624 42.288,79.326 42.288,79.548 42.439,79.699 42.208,79.93 42.208,80.007
  pour cut-out: 41.31,80.054 41.31,80.053 41.641,79.722 41.999,80.08 41.999,80.323 41.668,80.323 41.463,80.528
  pour cut-out: 41.49,81.039 41.49,81.026 41.88,80.636 41.602,80.358 41.344,80.358
  pour cut-out: 26.537,97.26 26.549,97.26 26.923,97.633 27.175,97.382 27.175,97.301 26.834,96.96
  pour cut-out: 47.954,9.34 50.454,9.34 50.454,9.798 47.954,9.798
  pour cut-out: 48.554,10.957 49.854,10.957 49.854,10.498 48.554,10.498
  pour cut-out: 40.294,46.387 40.727,45.954 40.727,46.118 40.92,46.312 40.589,46.643 40.348,46.402
  pour cut-out: 12.621,39.378 12.888,39.378 12.888,39.811 12.621,39.811
  pour cut-out: 17.192,38.328 17.459,38.328 17.459,38.761 17.192,38.761
  pour cut-out: 26.086,46.86 25.897,47.049 25.591,46.744 25.78,46.554
  pour cut-out: 27.743,43.316 27.932,43.505 27.627,43.811 27.437,43.622
  pour cut-out: 26.97,47.22 27.159,47.031 27.465,47.337 27.276,47.526
  pour cut-out: 26.685,47.525 26.495,47.336 26.801,47.03 26.99,47.219
  pour cut-out: 29.497,43.817 29.308,43.628 29.614,43.322 29.803,43.511
  pour cut-out: 28.786,42.594 28.976,42.405 29.281,42.711 29.092,42.9
  pour cut-out: 28.987,42.45 28.798,42.261 29.104,41.955 29.293,42.144
  pour cut-out: 28.984,43.378 28.795,43.189 29.101,42.883 29.29,43.072
  pour cut-out: 29.574,45.179 29.763,45.368 29.457,45.674 29.268,45.485
  pour cut-out: 29.085,44.729 29.274,44.918 28.968,45.223 28.779,45.034
  pour cut-out: 30.037,48.384 30.226,48.573 29.921,48.879 29.731,48.69
  pour cut-out: 33.441,40.431 33.252,40.621 32.946,40.315 33.135,40.126
  pour cut-out: 33.396,43.509 33.585,43.32 33.891,43.626 33.702,43.815
  pour cut-out: 34.166,44.29 34.355,44.479 34.049,44.785 33.86,44.596
  pour cut-out: 33.597,48.89 33.408,48.701 33.714,48.395 33.903,48.585
  pour cut-out: 33.386,49.061 33.575,48.872 33.881,49.178 33.692,49.367
  pour cut-out: 34.361,50.542 34.172,50.731 33.866,50.425 34.055,50.236
  pour cut-out: 33.573,51.656 33.384,51.467 33.69,51.161 33.879,51.35
  pour cut-out: 35.106,46.994 35.295,47.183 34.989,47.489 34.8,47.3
  pour cut-out: 34.966,49.362 34.777,49.173 35.083,48.867 35.272,49.056
  pour cut-out: 13.635,43.94 13.635,43.554 13.286,43.554 13.286,43.94
  pour cut-out: 31.426,49.752 31.616,49.941 31.31,50.247 31.121,50.058
  pour cut-out: 33.707,43.799 33.896,43.988 33.59,44.294 33.401,44.105
  pour cut-out: 33.141,42.004 32.952,41.815 33.258,41.509 33.447,41.698
  pour cut-out: 33.14,48.409 32.951,48.22 33.257,47.914 33.446,48.103
  pour cut-out: 34.055,52.097 33.866,51.908 34.172,51.602 34.361,51.791
  pour cut-out: 36.02,49.765 36.209,49.954 35.903,50.26 35.714,50.071
  pour cut-out: 24.714,46.407 24.525,46.596 24.219,46.29 24.408,46.101
  pour cut-out: 26.234,47.064 26.045,46.875 26.351,46.569 26.54,46.758
  pour cut-out: 28.659,46.098 28.848,46.287 28.542,46.593 28.353,46.404
  pour cut-out: 34.84,47.359 34.651,47.548 34.345,47.242 34.534,47.053
  pour cut-out: 28.201,43.802 28.39,43.992 28.084,44.297 27.895,44.108
  pour cut-out: 28.197,45.637 28.387,45.826 28.081,46.132 27.892,45.943
  pour cut-out: 36.918,45.181 37.107,45.37 36.801,45.676 36.612,45.486
  pour cut-out: 36.937,48.852 37.126,49.041 36.82,49.347 36.631,49.157
  pour cut-out: 37.422,45.612 37.611,45.801 37.305,46.107 37.116,45.918
  pour cut-out: 59.153,119.277 59.622,119.277 59.614,119.508 59.146,119.508
  pour cut-out: 52.807,115.365 52.476,115.034 52.644,114.876 52.976,115.207
  pour cut-out: 53.455,101.025 53.124,101.356 52.965,101.188 53.297,100.856
  pour cut-out: 66.279,96.446 66.279,96.915 66.048,96.908 66.048,96.439
  pour cut-out: 56.047,88.1 56.378,87.768 56.536,87.937 56.205,88.268
  pour cut-out: 56.382,83.103 56.051,82.772 56.22,82.614 56.551,82.945
  pour cut-out: 25.481,114.6 25.15,114.931 24.992,114.762 25.323,114.431
  pour cut-out: 14.453,81.662 14.121,81.993 13.963,81.825 14.294,81.493
  pour cut-out: 16.429,82.676 16.098,83.007 15.94,82.839 16.271,82.507
  pour cut-out: 15.621,89.003 15.953,89.334 15.784,89.493 15.453,89.161
  pour cut-out: 16.131,88.491 16.462,88.822 16.294,88.981 15.962,88.649
  pour cut-out: 16.636,88.017 16.967,88.348 16.798,88.507 16.467,88.175
  pour cut-out: 13.98,95.306 14.311,94.974 14.47,95.143 14.138,95.474
  pour cut-out: 15.954,96.331 16.286,96 16.444,96.168 16.113,96.5
  pour cut-out: 15.774,102.97 15.443,102.639 15.611,102.481 15.943,102.812
  pour cut-out: 16.281,102.49 15.95,102.159 16.118,102.001 16.45,102.332
  pour cut-out: 16.792,102.006 16.461,101.674 16.63,101.516 16.961,101.847
  pour cut-out: 25.29,128 25.459,128.269 25.128,128.6 24.959,128.331
  pour cut-out: 48.473,102.09 48.253,102.209 47.973,101.929 48.193,101.809
  pour cut-out: 47.942,113.783 48.162,113.664 48.442,113.944 48.223,114.064
  pour cut-out: 52.458,110.114 52.678,109.994 52.958,110.274 52.738,110.394
  pour cut-out: 52.459,123.72 52.679,123.6 52.959,123.88 52.739,124
L8:Bot:
  pour cut-out: 3.156,78.659 cw(c3.156,80.075) 3.156,81.49 8.236,81.49 cw(c8.236,80.075) 8.236,78.659
  pour cut-out: 43.534,158.657 ccw(c44.916,158.609) 46.298,158.657 ccw(c44.916,158.609)
  pour cut-out: 24.824,143.654 ccw(c26.018,143.613) 27.213,143.654 ccw(c26.018,143.613)
  pour cut-out: 33.709,164.141 ccw(c35.327,164.085) 36.946,164.141 ccw(c35.327,164.085)
  pour cut-out: 13.209,163.791 ccw(c14.827,163.735) 16.446,163.791 ccw(c14.827,163.735)
  pour cut-out: 13.209,138.791 ccw(c14.827,138.735) 16.446,138.791 ccw(c14.827,138.735)
  pour cut-out: 33.709,138.441 ccw(c35.327,138.385) 36.946,138.441 ccw(c35.327,138.385)
  pour cut-out: 54.209,138.791 ccw(c55.827,138.735) 57.446,138.791 ccw(c55.827,138.735)
  pour cut-out: 54.209,163.791 ccw(c55.827,163.735) 57.446,163.791 ccw(c55.827,163.735)
  pour cut-out: 8.48,75.867 cw(c9.896,75.867) 11.311,75.867 11.311,73.303 cw(c9.896,73.303) 8.48,73.303
  pour cut-out: 54.815,75.867 cw(c56.231,75.867) 57.647,75.867 57.647,58.088 cw(c56.231,58.088) 54.815,58.088
  pour cut-out: 33.604,69.251 ccw(c34.868,69.207) 36.132,69.251 ccw(c34.868,69.207)
  pour cut-out: 28.017,23.993 ccw(c29.211,23.952) 30.406,23.993 ccw(c29.211,23.952)
  pour cut-out: 30.622,20.959 ccw(c32.241,20.903) 33.859,20.959 ccw(c32.241,20.903)
  pour cut-out: 56.078,46.415 ccw(c57.697,46.359) 59.315,46.415 ccw(c57.697,46.359)
  pour cut-out: 30.198,72.295 ccw(c31.816,72.239) 33.435,72.295 ccw(c31.816,72.239)
  pour cut-out: 4.742,46.839 ccw(c6.361,46.783) 7.979,46.839 ccw(c6.361,46.783)
  pour cut-out: 26.823,84.1 26.46,83.737 26.46,83.693 26.768,83.693 26.937,83.524 27.229,83.816 27.229,83.885
  pour cut-out: 12.959,84.104 12.961,84.106 12.961,84.776 12.802,84.776 12.136,84.11 12.136,83.656 12.393,83.399
  pour cut-out: 12.959,97.604 12.959,98.275 12.93,98.304 12.375,97.749 12.375,97.198 12.12,96.943
  pour cut-out: 13.169,111.404 13.138,111.435 12.57,111.435 12.57,110.926 12.528,110.884 12.584,110.829 12.584,110.71
  pour cut-out: 13.169,125.004 13.168,125.005 12.617,125.005 12.617,124.472 12.565,124.421
  pour cut-out: 36.616,127.759 35.911,128.464 35.302,127.855 35.302,127.676
  pour cut-out: 36.398,125.01 36.398,124.176 36.222,124 35.662,124 35.662,124.646 35.601,124.707
  pour cut-out: 36.216,111.211 36.223,111.204 36.223,110.301 35.784,110.301 35.445,110.64 35.445,111.225
  pour cut-out: 36.707,100.698 36.707,100.699 36.002,101.403 35.393,100.794 35.393,100.616
  pour cut-out: 36.216,97.811 36.216,97.262 36.225,97.254 36.083,97.112 35.86,97.112 35.86,97.421 35.518,97.763
  pour cut-out: 36.707,87.198 36.707,87.199 36.002,87.903 35.393,87.294 35.393,87.116
  pour cut-out: 41.991,79.624 42.288,79.327 42.288,79.491 42.519,79.722 42.275,79.966 42.275,79.989
  pour cut-out: 41.31,80.054 41.314,80.054 41.646,79.722 41.783,79.859 41.783,80.33 41.6,80.514
  pour cut-out: 41.49,81.039 41.827,80.702 41.827,80.601 41.576,80.35 41.509,80.417 41.346,80.417
  pour cut-out: 33.903,56.615 33.904,56.615 34.184,56.895 34.49,56.588 34.49,56.433 34.194,56.138
  pour cut-out: 26.564,97.251 26.936,97.623 26.936,97.606 27.185,97.357 26.871,97.044 26.871,96.94
  pour cut-out: 26.893,113.679 26.893,113.689 27.226,114.022 27.293,113.956 27.293,113.595 27.263,113.565
  pour cut-out: 24.904,128.281 24.909,128.281 25.217,128.589 25.449,128.356 25.449,128.309 25.189,128.048
  pour cut-out: 44.948,150.849 43.405,150.849 43.405,149.503 43.657,149.25 43.657,147.435 44.655,147.435 44.655,150.544
  pour cut-out: 44.336,149.328 45.551,149.328 45.548,149.325 45.548,148.355 44.355,148.355 44.325,148.324
  pour cut-out: 42.793,149.328 44.009,149.328 44.005,149.325 44.005,148.355 42.813,148.355 42.782,148.324
  pour cut-out: 46.155,152.24 46.155,151.322 46.168,151.309 46.952,151.309 46.952,152.24
  pour cut-out: 45.657,152.972 44.24,152.975 44.24,151.706 44.314,151.632 44.395,151.713 45.652,151.713
  pour cut-out: 42.688,152.972 44.104,152.975 44.104,151.706 44.03,151.632 43.949,151.713 42.692,151.713
  pour cut-out: 63.479,98.835 67.079,98.835 67.079,97.265 63.479,97.265
  pour cut-out: 37.505,44.466 37.5,44.462 37.5,43.772 37.912,43.772 37.975,43.835
  pour cut-out: 36.422,38.94 36.422,38.946 37.029,39.552 37.263,39.318 37.233,39.318 36.549,38.634
  pour cut-out: 37.883,39.294 37.883,39.286 38.767,38.402 38.561,38.196 38.366,38.196
  pour cut-out: 36.622,37.864 37.329,37.157 37.624,37.157 37.987,37.519 37.332,38.175 37.137,38.175
  pour cut-out: 32.322,37.638 32.323,37.639 32.549,37.639 32.662,37.526 32.83,37.695 32.989,37.695 32.989,37.818 32.759,38.048
  pour cut-out: 47.954,9.34 50.454,9.34 50.454,9.798 47.954,9.798
  pour cut-out: 48.554,10.957 49.854,10.957 49.854,10.498 48.554,10.498
  pour cut-out: 40.294,46.387 40.608,46.701 40.82,46.701 40.82,46.412 40.92,46.312 40.634,46.026 40.593,46.026
  region net GND: 11.92,43.329 11.278,42.687 11.278,43.329
  region net GND: 11.92,47.329 11.278,46.687 11.278,47.329
  region net GND: 11.92,51.329 11.278,50.687 11.278,51.329
  pour cut-out: 13.322,54.581 13.189,54.852 12.84,54.728 12.938,54.399
  region net GND: 11.92,52.129 11.278,51.487 11.278,52.129
  region net DRAM_1V5: 12.14,53.579 12.14,52.879 10.54,52.879 10.54,54.379 13.045,54.379 13.045,53.579
  pour cut-out: 18.27,52.079 18.27,40.079 11.87,40.079 11.87,52.079
  pour cut-out: 25.778,46.588 26.058,46.869 25.879,47.048 25.599,46.768
  pour cut-out: 27.252,47.476 26.971,47.196 27.15,47.016 27.431,47.297
  pour cut-out: 26.993,47.193 26.713,47.473 26.534,47.294 26.814,47.014
  pour cut-out: 29.714,45.393 29.433,45.673 29.254,45.494 29.534,45.213
  pour cut-out: 29.278,44.892 28.998,45.173 28.819,44.994 29.099,44.713
  pour cut-out: 30.207,48.594 29.926,48.875 29.747,48.695 30.028,48.415
  pour cut-out: 33.885,48.598 33.604,48.879 33.425,48.699 33.706,48.419
  pour cut-out: 33.694,49.359 33.414,49.079 33.593,48.899 33.873,49.18
  pour cut-out: 35.32,46.797 35.609,46.78 35.461,47.151 35.099,47.026
  pour cut-out: 34.819,47.307 35.099,47.026 35.279,47.205 34.998,47.486
  pour cut-out: 35.254,49.044 34.973,49.324 34.794,49.145 35.075,48.864
  pour cut-out: 36.636,45.481 36.916,45.201 37.096,45.38 36.815,45.66
  pour cut-out: 33.417,48.122 33.136,48.402 32.957,48.223 33.237,47.943
  pour cut-out: 37.097,45.938 37.377,45.657 37.557,45.837 37.276,46.117
  pour cut-out: 26.06,46.864 26.34,46.583 26.52,46.763 26.239,47.043
  pour cut-out: 28.803,46.304 28.522,46.584 28.343,46.405 28.623,46.125
  pour cut-out: 34.524,47.048 34.804,47.329 34.625,47.508 34.345,47.228
  pour cut-out: 33.238,49.785 32.958,49.505 33.137,49.326 33.417,49.606
  pour cut-out: 34.155,50.723 33.874,50.442 34.054,50.263 34.334,50.544
  pour cut-out: 33.405,51.458 33.686,51.178 33.865,51.357 33.584,51.638
  pour cut-out: 31.121,50.08 31.402,49.799 31.581,49.979 31.301,50.259
  pour cut-out: 32.949,52.273 32.669,52.553 32.49,52.374 32.77,52.094
  pour cut-out: 34.048,52.077 34.328,52.358 34.149,52.537 33.868,52.257
  pour cut-out: 33.866,51.917 34.146,51.636 34.326,51.816 34.045,52.096
  region net VCCF: 56.709,92.263 56.709,90.45 58.464,90.45 58.464,92.263
  pour cut-out: 56.13,123.168 56.417,123.147 56.474,122.823 56.13,122.823
  pour cut-out: 16.282,96.006 16.451,96.175 16.12,96.506 15.951,96.338
  pour cut-out: 14.297,95 14.465,95.169 14.134,95.5 13.965,95.332
  pour cut-out: 14.261,81.524 14.43,81.692 14.098,82.024 13.93,81.855
  pour cut-out: 16.29,82.5 16.459,82.669 16.128,83 15.959,82.831
  pour cut-out: 59.129,119.637 59.129,119.232 59.145,119.216 59.575,119.216 59.572,119.631
  pour cut-out: 61.792,112.978 62.385,112.978 62.385,113.414 62.371,113.428 61.806,113.428
  pour cut-out: 56.259,96.768 56.256,96.764 56.256,96.018 56.545,96.018 56.555,96.008 56.555,96.768 56.561,96.774
  pour cut-out: 7.805,111.888 7.809,112.521 9.931,112.528 9.938,111.898
  pour cut-out: 7.805,98.488 7.809,99.121 9.931,99.128 9.938,98.498
  pour cut-out: 56.163,88.234 56.065,87.949 56.4,87.79 56.563,88.092
  pour cut-out: 56.609,95.883 56.511,95.598 56.845,95.439 57.008,95.741
  pour cut-out: 56.612,84.989 56.617,85.622 58.536,85.628 58.543,84.998
  pour cut-out: 58.51,99.989 58.506,99.357 56.586,99.35 56.58,99.98
  pour cut-out: 56.612,111.889 56.617,112.522 58.536,112.528 58.543,111.898
  pour cut-out: 58.611,127.511 58.606,126.878 56.687,126.872 56.681,127.502
  pour cut-out: 7.918,124.822 7.923,125.455 9.842,125.461 9.848,124.831
  pour cut-out: 7.805,84.988 7.809,85.621 9.931,85.628 9.938,84.998
  region net A1V2: 58.459,107.9 59.359,107.9 59.359,108.776 60.183,109.6 61.227,109.6 61.227,111.093 59.661,111.102 58.459,109.9

## Silkscreen, mask and mechanical layers (free items; w line width, h text height)
Top Overlay:
  circle w0.2: c65,165 r3
  circle w0.2: c5,165 r3
  circle w0.2: c5,67.5 r3
  circle w0.2: c5,5 r3
  circle w0.2: c65.002,15.263 r3
  circle w0.2: c65,67.5 r3
  circle w0.2: c65,130 r3
  circle w0.2: c5,130 r3
  region: 30.02,167.423 29.216,168.227 30.823,168.227
  region: 43.162,18.496 41.866,17.2 41.469,18.857
  lines w0.127: 23.555,46.579 32.04,38.094 40.525,46.579 32.04,55.065 23.555,46.579
  lines w0.15: 60.932,123.211 62.932,123.211 ; 60.932,124.21 61.932,123.21 62.932,124.211 60.932,124.211
  lines w0.2: 3.115,81.761 3.115,82.383 5.677,82.383 ; 5.677,81.744 5.677,82.346 ; 5.715,77.772 8.276,77.772 8.276,78.394 ; 5.715,77.808 5.715,78.41
  text "TH58TEGH2HBAS9" at 31.959,168.494 h1.4
  text "BGA-132" at 31.655,167.269 h1.4
  text "TH58NVG7H2HTAK0" at 16.722,133.09 h1.4
  text "5V" at 66.382,124.659 h1.4
  text "1V2" at 58.169,108.855 h1.4
  text "3V3" at 56.869,104.21 h1.4
  text "BGA" at 3.359,82.723 h1.4
  text "1V8" at 67.194,81.844 h1.4
  text "TSSOP" at 4.89,76.49 h1.4
  text "FLASH SWITCH" at 1.489,76.166 h1.4 r90
  text "3V3" at 65.816,75.738 h1.4
  text "VCCF" at 11.732,75.285 h1.4
  text "3V3" at 11.747,73.966 h1.4
  text "SW1" at 47.348,73.56 h1.4
  text "A3V3" at 54.38,73.165 h1.4 r90
  text "1V8" at 54.379,68.624 h1.4 r90
  text "VCCIO" at 53.151,68.143 h1.4 r90
  text "ROM" at 47.188,68.125 h1.4
  text "1V2" at 54.379,63.59 h1.4 r90
  text "VCCK" at 53.151,63.157 h1.4 r90
  text "A1V2" at 54.38,58.025 h1.4 r90
  text "BGA-288" at 61.358,48.984 h1.4 r315
  text "SM2246EN" at 60.384,48.24 h1.4 r315
  text "STAND SSD 2246 (CPU)" at 1.368,11.859 h1.4